# EAGLE board Magnificent Waasa (EAGLE 9.7.0)

Size 128.23 x 112.11 mm. Coordinates in mm from the lower left corner, seen from the top.
Outline: 0,0 128.23,0 128.23,112.11 0,112.11 0,0
Copper layers (1*16): Top 0.035mm / dielectric 1.5mm / Bottom 0.035mm
Design rules "default": minimum track width 6mil, minimum drill 0.35mm, track to track 6mil, track to pad 6mil, pad to pad 6mil, via to via 6mil, smd to smd 6mil, copper to edge 40mil, drill to drill 6mil, minimum pad ring 10mil, minimum via ring 8mil, stop-mask expansion 4mil, vias tented up to drill 0mil, thermal gap 10mil

## Footprints (pad centres in the part's own frame; a part is rotated, then mirrored left to right if it is on the bottom)
LEDRD254W60D565H860B_O = drill 0.981 pad 1.581: 1 -1.27,0; 2 1.27,0
28027 = drill 1.016 long: 1 -2.54,0; 2 0,0; 3 2.54,0
RESAD1016W63L850D250B = drill 0.83 pad 1.43: 1 -5.08,0; 2 5.08,0
SG90 = drill 1.016 long: 1 -2.54,0; 2 0,0; 3 2.54,0
ARDUINO-UNO-R3-SHIELD = drill 1.016 pad 1.88: 3.3V 24.13,-2.54; 5V 24.13,0; A0 24.13,12.7; A1 24.13,15.24; A2 24.13,17.78; A3 24.13,20.32; A4 24.13,22.86; A5 24.13,25.4; AREF -24.13,-13.97; D2 -24.13,20.32; D3 -24.13,17.78; D4 -24.13,15.24; D5 -24.13,12.7; D6 -24.13,10.16; D7 -24.13,7.62; D8 -24.13,3.81; D9 -24.13,1.27; D10 -24.13,-1.27; D11 -24.13,-3.81; D12 -24.13,-6.35; D13 -24.13,-8.89; GND@0 24.13,2.54; GND@1 24.13,5.08; GND@2 -24.13,-11.43; IOREF 24.13,-7.62; NC 24.13,-10.16; RES 24.13,-5.08; RX -24.13,25.4; SCL -24.13,-19.05; SDA -24.13,-16.51; TX -24.13,22.86; VIN 24.13,7.62
TSOP48 = drill 0.8: 1 -2.54,0; 2 0,0; 3 2.54,0

## Placement (x,y rotation side)
D1  ORANGE  [LEDRD254W60D565H860B_O]  91.27,57.43 90 top
PIR1  PIR-SENSOR_28027  [28027]  53.03,6.35 180 top
R1  1k  [RESAD1016W63L850D250B]  75.28,56.35 0 top
SERVO1  SERVOSG90  [SG90]  121.17,11.01 180 top
SERVO2  SERVOSG90  [SG90]  121.17,99.57 0 top
U1  ARDUINO-UNO-R3-SHIELD  [ARDUINO-UNO-R3-SHIELD]  35.73,64.23 180 top
U3  IR-RECEIVERTSOP48  [TSOP48]  6.35,61.43 90 top

## Library data of the parts
D1 = Tinkercad; CATEGORY: Opto-Electronic; SUB-CATEGORY: LED; VALUE: LED_ORANGE
PIR1 R1 SERVO1 SERVO2 U1 U3 = Tinkercad

## Nets
D1_A: D1.1 R1.2
U1_5V: PIR1.2 SERVO1.2 SERVO2.2 U1.5V U3.3
U1_D2: U1.D2 U3.1
U1_D3: PIR1.1 U1.D3
U1_D7: R1.1 U1.D7
U1_D9: SERVO1.3 U1.D9
U1_D10: SERVO2.3 U1.D10
U1_GND: D1.2 PIR1.3 SERVO1.1 SERVO2.1 U1.GND@0 U1.GND@1 U1.GND@2 U3.2

## Tracks (layer width: path | path; a pad name or v marks a point on that pad's centre or on a via)
D1_A  (1 unrouted)
U1_5V  (4 unrouted)
U1_D2  (1 unrouted)
U1_D3  (1 unrouted)
U1_D7  (1 unrouted)
U1_D9  (1 unrouted)
U1_D10  (1 unrouted)
U1_GND  (7 unrouted)